# Altium PCB Smart_Station.PcbDoc
Units mm, origin at the board's own origin, x right, y up, seen from the top; angles counter-clockwise.
Board outline 80 x 70 mm, 2 copper layers (Top Layer, Bottom Layer); 24 components, 19 nets, 94 pads, 1 vias.
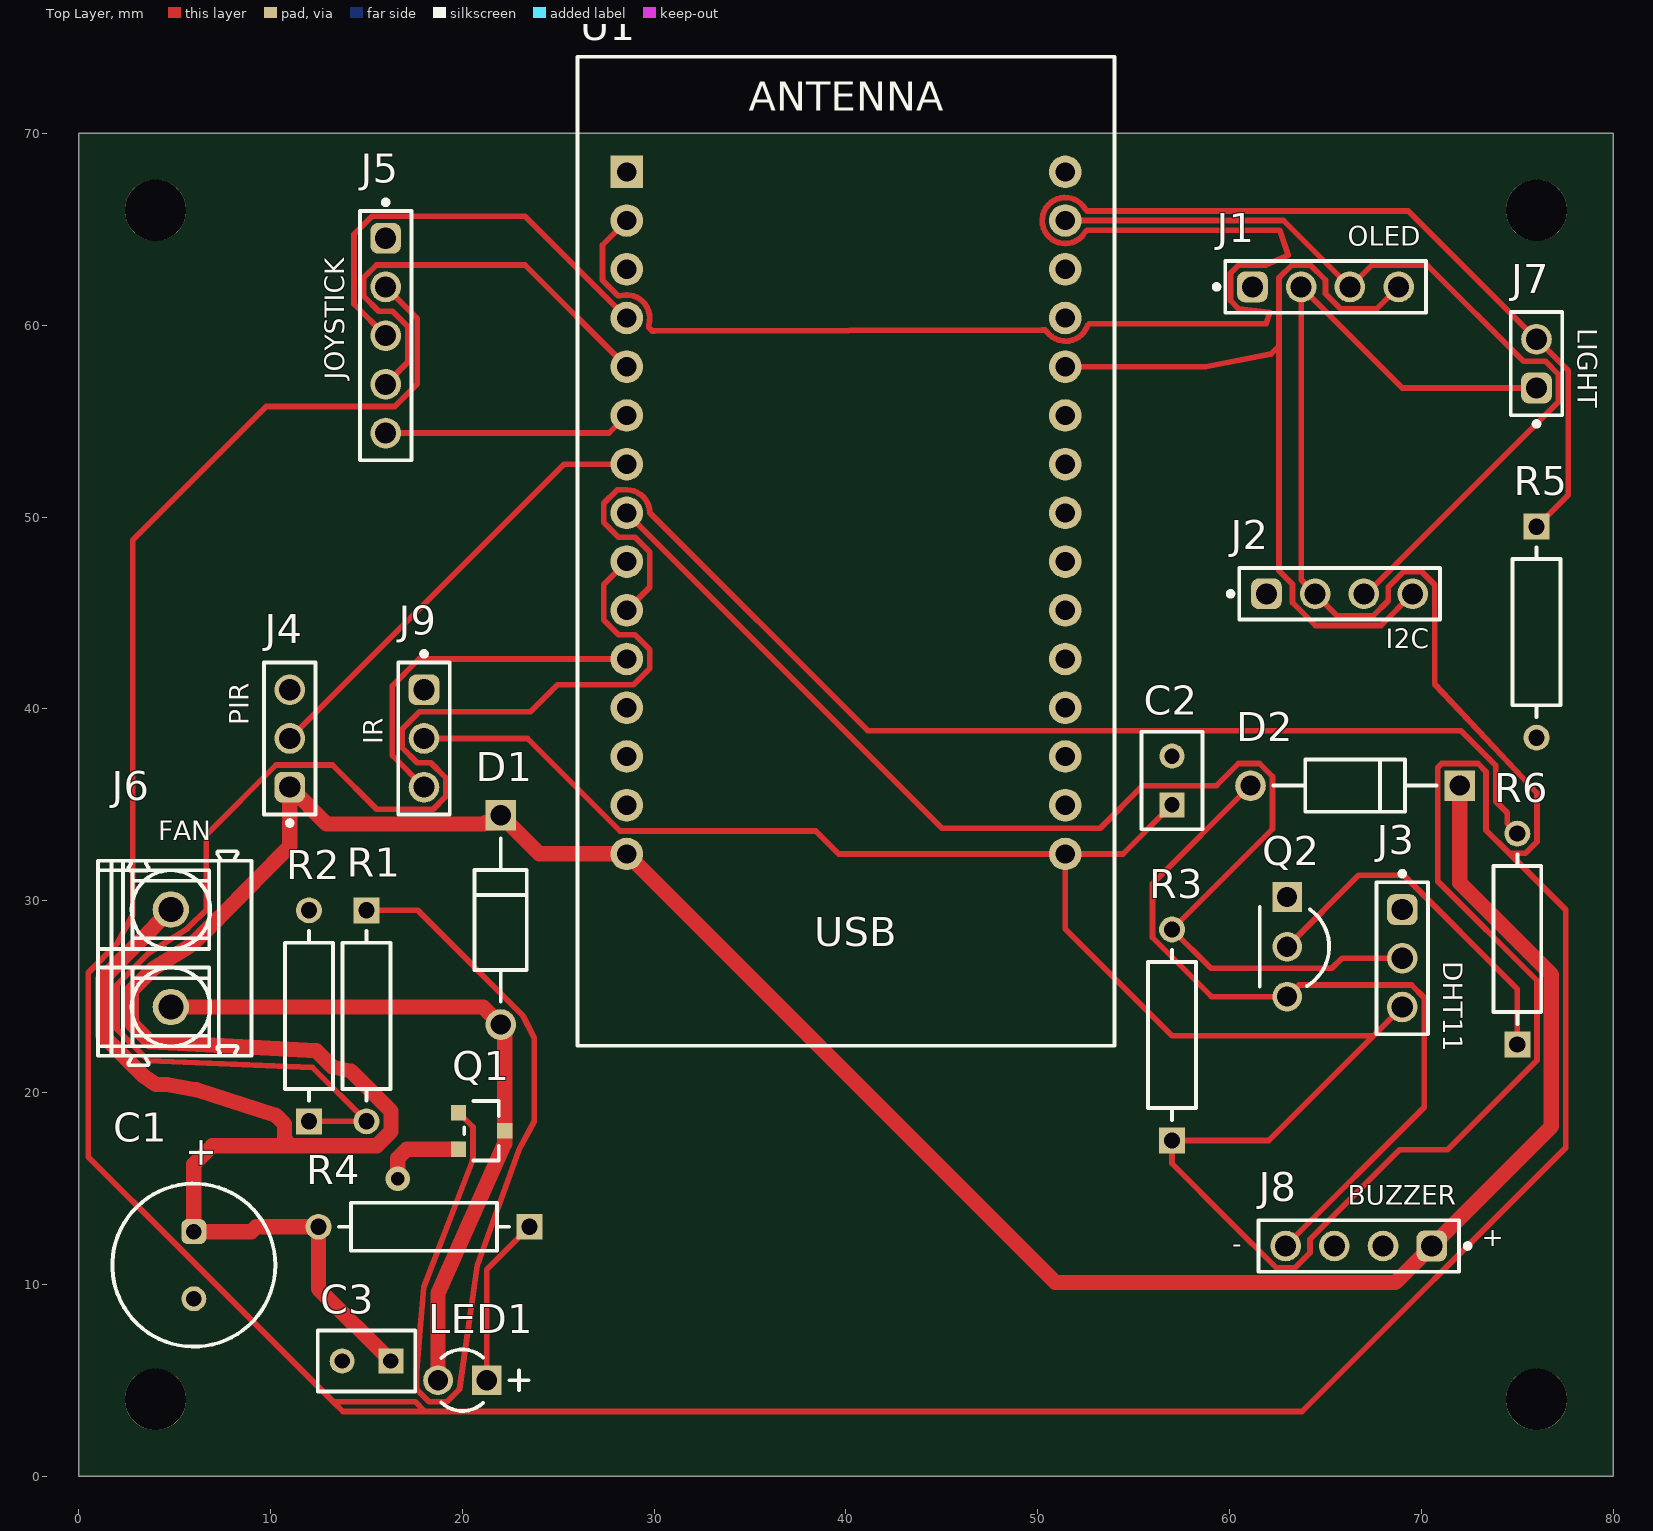
[diagram p0: Top Layer view]
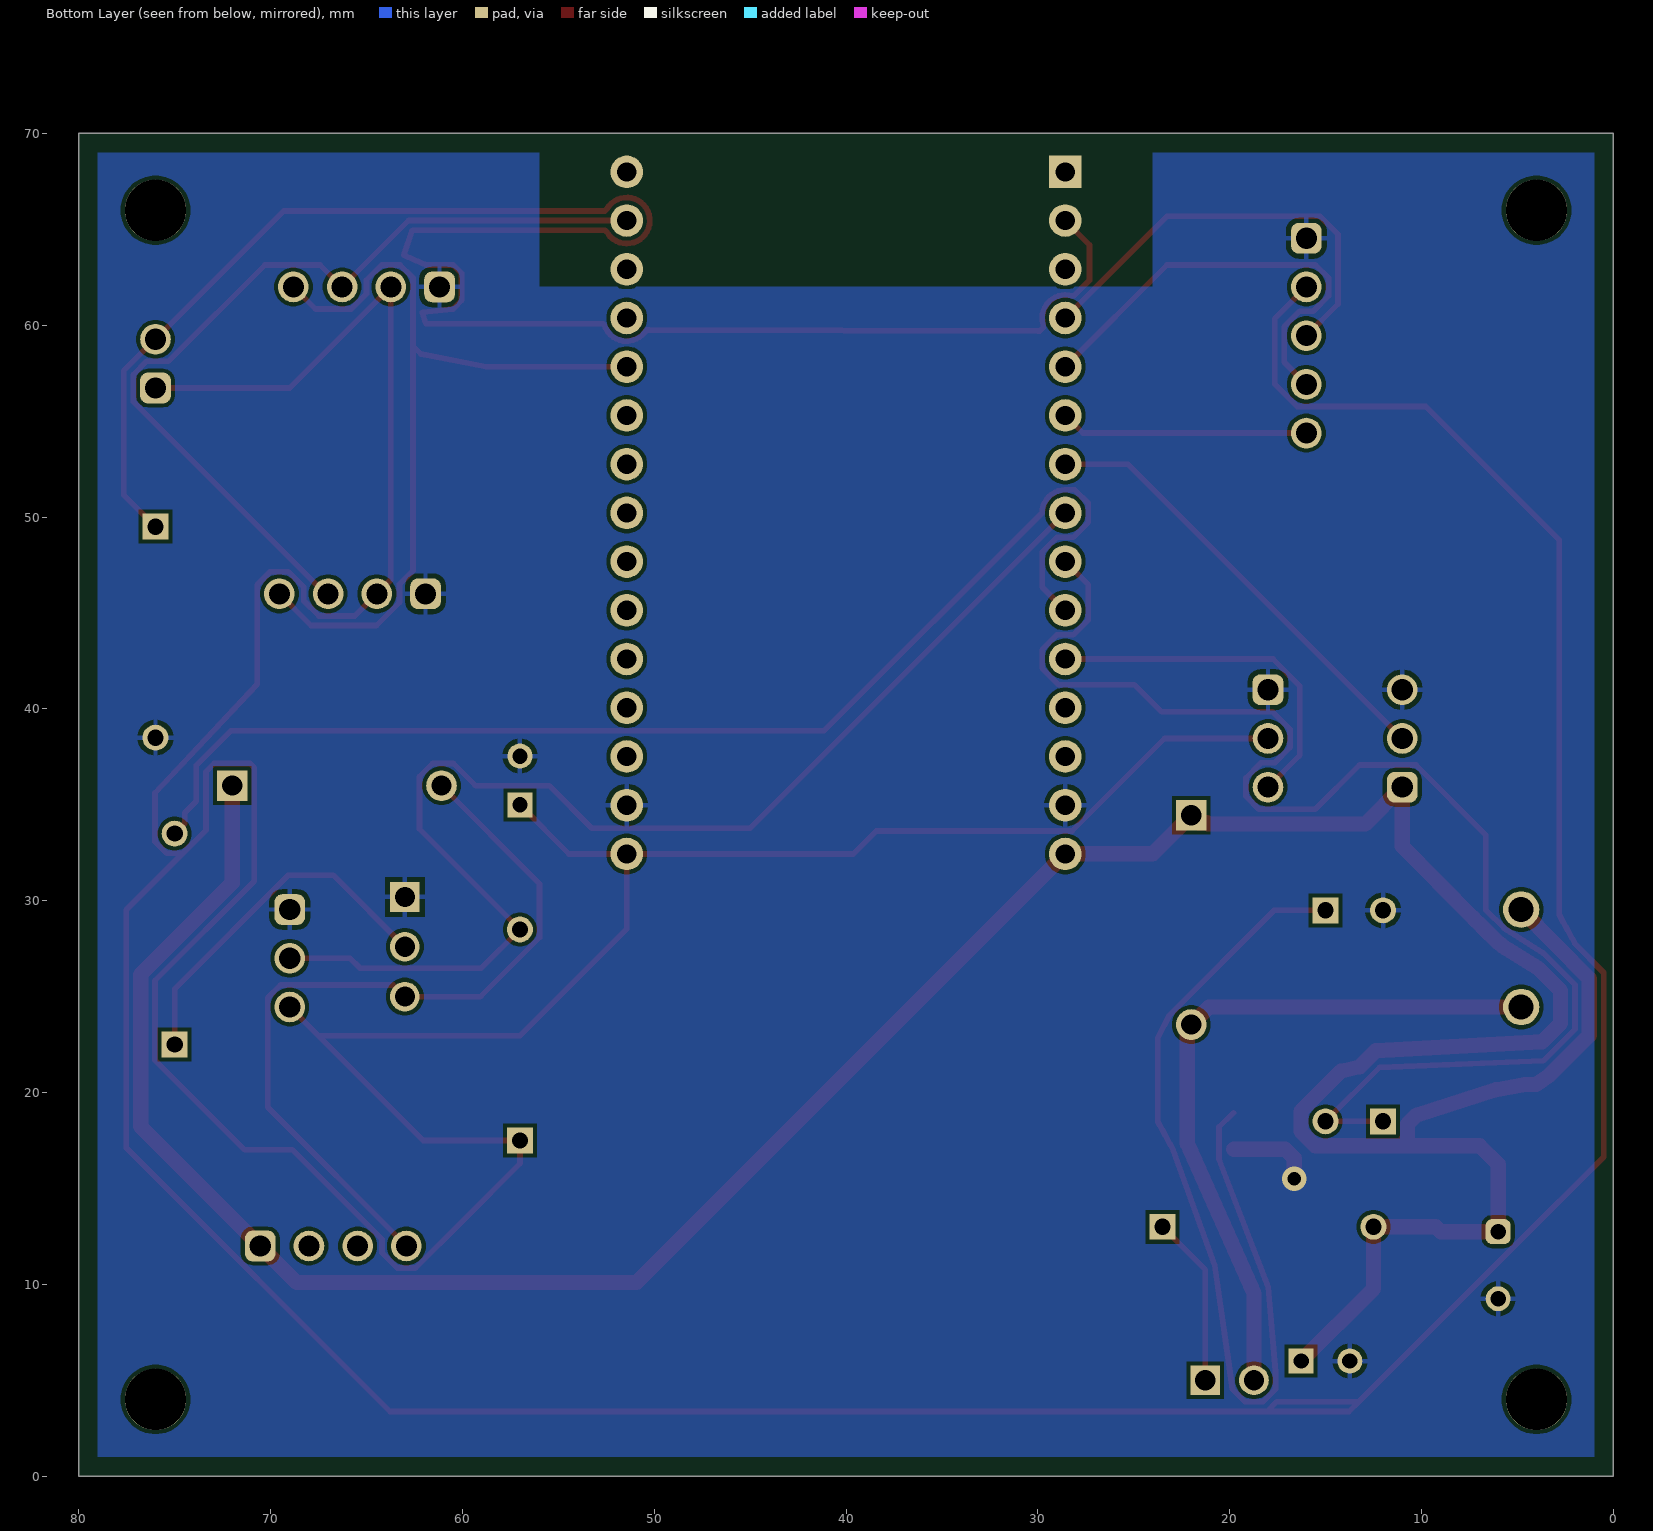
[diagram p1: Bottom Layer view, seen from below]
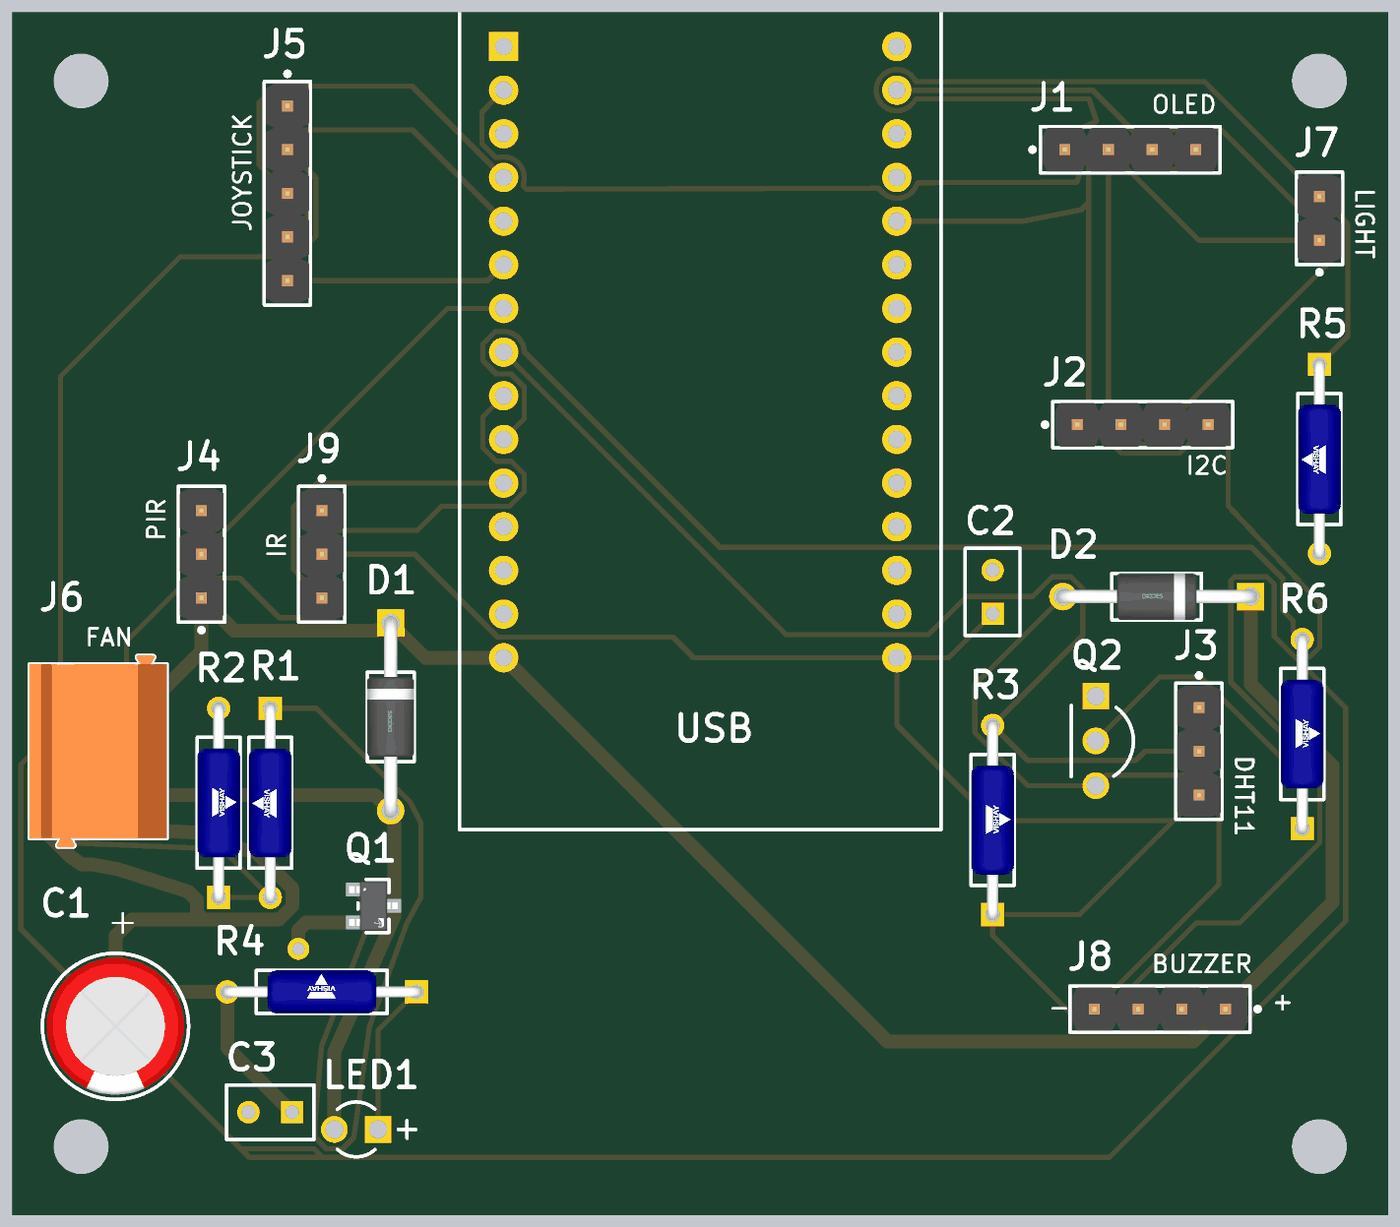
[diagram p2: 3D render of the assembled board from above, using the file's embedded part models]

## Layer stack, top to bottom
Top Solder: solder mask 0.0102, Solder Resist, Dk 3.5
Top Layer: signal copper 0.0356
Dielectric 1: dielectric 0.32, FR-4, Dk 4.8
Bottom Layer: signal copper 0.0356
Bottom Solder: solder mask 0.0102, Solder Resist, Dk 3.5

## Board outline
0,0 0,70 80,70 80,0

## Design rules (kind name [scope] priority, off if disabled: settings)
Clearance [All] p1: gap=0.2 ignorepadtopadclearanceinfootprint=FALSE
HoleSize [All] p1: absolutevalues=TRUE maxlimit=6.4 minlimit=0.3 maxpercent=80.000 minpercent=20.000
PolygonConnect [All] p1: connectstyle=Relief reliefconductorwidth=0.254 reliefentries=4 polygonreliefangle="90 Angle" airgapwidth=0.254
RoutingVias [All] p1: holewidth=0.4 width=0.8 viastyle="Through Hole" minholewidth=0.4 minwidth=0.8 maxholewidth=0.4 maxwidth=0.8
SolderMaskExpansion [All] p1: expansion=0 istentingtop=FALSE
SupplyNets "Schematic Supply Nets_2" [InNet('+3V3')] p1: voltage=0.000
SupplyNets "Schematic Supply Nets_1" [InNet('+5V')] p2: voltage=0.000
SupplyNets "Schematic Supply Nets" [InNet('GND')] p3: voltage=0.000
Width Power [InNet('+5V') or InNet('GND') or InNet('FAN_NEG')] p1: maxlimit=1.5 minlimit=0.2 preferedwidth=0.8
Width [All] p2: maxlimit=1.5 minlimit=0.2 preferedwidth=0.3
29 further rules are at their usual default settings.

## Components (designator, comment, footprint, x,y, rotation, side; value= is the part's Value field where it differs from the comment)
C1 "860020374012" WCAP-ATG5_D8H11.5 6,11 r90 top
C2 "C320C104K5R5TA" CAPR51-254-508X318X736 57,36.27 r90 top
C3 "C320C104K5R5TA" CAPR51-254-508X318X736 15,6 r180 top
D1 "1N5819-T" FP-DO-41_Plastic-MFG 22,29 r270 top value="110 pF"
D2 "1N5819-T" FP-DO-41_Plastic-MFG 66.544,36 r180 top value="110 pF"
J1 "61300411121" 61300411121 65,62 r0 top
J2 "61300411121" 61300411121 65.73,46 r0 top
J3 "61300311121" 61300311121 69,27 r270 top
J4 "61300311121" 61300311121 11,38.46 r90 top
J5 "61300511121" 61300511121 16,59.46 r270 top
J6 "1760490000" PM_5_08_90_02 5,27 r270 top
J7 "61300211121" 61300211121 76,58 r90 top
J8 "61300411121" 61300411121 66.73,12 r180 top
J9 "61300311121" 61300311121 18,38.46 r270 top
LED1 "L-934GD" KING-L-934GD 20,5 r180 top
Q1 "AO3400A" FP-SOT23-MFG 21,18 r0 top
Q2 "PN2222ATF" FAIR-TO-92-3 63,27.6 r270 top
R1 "100R" FP-RLR07-MFG 15,24 r270 top
R2 "100K" FP-RLR07-MFG 12,24 r90 top
R3 "RLR07C1002FSB14" FP-RLR07-MFG 57,23 r90 top
R4 "1K" FP-RLR07-MFG 18,13 r180 top
R5 "10K" FP-RLR07-MFG 76,44 r270 top
R6 "1K" FP-RLR07-MFG 75,28 r90 top
U1 "ESP32_DEVKIT_V1_30P" ESP32_DEVKIT_V1_30P 28.57,68 r0 top

## Footprints (in the part's own frame and the unit in brackets; to place one, negate y for a bottom-side part, rotate by r counter-clockwise, add the part's x,y. Pads: shape width x height; smd on the part's side, far side on the other; paste and mask are expansions set on the pad)
61300211121 [mm] "Pin Header, pitch 2.54 mm, THT, Vertical, single row, 2p"
  rrect50% 1.6x1.6 hole 1.1: 1(-1.27,0)
  round 1.6 hole 1.1: 2(1.27,0)
  silkscreen extent -3.26,-1.34 2.69,1.35, body extent -2.54,-1.27 2.54,1.27, height 8.57
61300311121 [mm] "Pin Header, pitch 2.54 mm, THT, Vertical, single row, 3p"
  rrect50% 1.6x1.6 hole 1.1: 1(-2.54,0)
  round 1.6 hole 1.1: 2(0,0) 3(2.54,0)
  silkscreen extent -4.53,-1.35 3.96,1.34, body extent -3.81,-1.27 3.81,1.27, height 8.57
61300411121 [mm] "Pin Header, pitch 2.54 mm, THT, Vertical, single row, 4p"
  rrect50% 1.6x1.6 hole 1.1: 1(-3.81,0)
  round 1.6 hole 1.1: 2(-1.27,0) 3(1.27,0) 4(3.81,0)
  silkscreen extent -5.8,-1.35 5.23,1.35, body extent -5.08,-1.27 5.08,1.27, height 8.57
61300511121 [mm] "Pin Header, pitch 2.54 mm, THT, Vertical, single row, 5p"
  rrect50% 1.6x1.6 hole 1.1: 1(-5.08,0)
  round 1.6 hole 1.1: 2(-2.54,0) 3(0,0) 4(2.54,0) 5(5.08,0)
  silkscreen extent -7.07,-1.34 6.5,1.35, body extent -6.35,-1.27 6.35,1.27, height 8.57
CAPR51-254-508X318X736 [mm] "THD, 2-Leads, Body 5.08x3.18mm"
  rect 1.3x1.3 hole 0.8: 1(-1.27,0)
  round 1.3 hole 0.8: 2(1.27,0)
  silkscreen extent -2.54,-1.59 2.54,1.59, body extent -2.54,-1.59 2.54,1.59, height 7.36
ESP32_DEVKIT_V1_30P [mm]
  rect 1.7x1.7 hole 1: 1(0,0)
  round 1.7 hole 1: 2(0,-2.54) 3(0,-5.08) 4(0,-7.62) 5(0,-10.16) 6(0,-12.7) 7(0,-15.24) 8(0,-17.78) 9(0,-20.32) 10(0,-22.86) 11(0,-25.4) 12(0,-27.94) 13(0,-30.48) 14(0,-33.02) 15(0,-35.56) 16(22.86,-35.56) 17(22.86,-33.02) 18(22.86,-30.48) 19(22.86,-27.94) 20(22.86,-25.4) 21(22.86,-22.86) 22(22.86,-20.32) 23(22.86,-17.78) 24(22.86,-15.24) 25(22.86,-12.7) 26(22.86,-10.16) 27(22.86,-7.62) 28(22.86,-5.08) 29(22.86,-2.54) 30(22.86,0)
  silkscreen extent -2.57,-45.56 25.43,6
FAIR-TO-92-3 [mm] "TO, 3-Leads, Body Dia 4.79mm, Pitch 2.6mm"
  rect 1.55x1.55 hole 1.05: 1(-2.6,0)
  round 1.55 hole 1.05: 2(0,0) 3(2.6,0)
  silkscreen extent -2.07,-1.43 2.07,2.19, body extent -2.4,-1.47 2.4,2.2, height 8.49
FP-DO-41_Plastic-MFG [mm]
  rect 1.6x1.6 hole 1.05 paste-2539.97 mask+0: 1(-5.456,0)
  round 1.6 hole 1.05 paste-2539.97 mask+0: 2(5.456,0)
  silkscreen extent -4.26,-1.36 4.26,1.36, body extent -6.36,-1.46 6.36,1.46, height 0.25
FP-RLR07-MFG [mm]
  rect 1.35x1.35 hole 0.85 paste-2539.97 mask+0: 1(-5.5,0)
  round 1.35 hole 0.85 paste-2539.97 mask+0: 2(5.5,0)
  silkscreen extent -4.42,-1.25 4.42,1.25, body extent -6.27,-1.35 6.27,1.35, height 0.25
FP-SOT23-MFG [mm]
  rect 0.8x0.8 smd paste+0 mask+0: 1(-1.2,0.95) 2(-1.2,-0.95) 3(1.2,0)
  silkscreen extent -0.9,-1.55 0.9,1.55, body extent -1.7,-1.78 1.7,1.78, height 0.25
KING-L-934GD [mm] "THD, 2-Leads, Dia 3.2mm, Body Length 4.9mm"
  rect 1.55x1.55 hole 1.05: 1(-1.27,0)
  round 1.55 hole 1.05: 2(1.27,0)
  silkscreen extent -3.46,-1.6 1.1,1.6
PM_5_08_90_02 [mm] "PM 5.08/02/90 3.5"
  round 1.9 hole 1.3: A1(-2.54,-0.2) A2(2.54,-0.2)
  silkscreen extent -5.58,-4 5.58,4, body extent -5.58,-4 5.58,4, height 10.01
WCAP-ATG5_D8H11.5 [mm] "Aluminum Electrolytic Capacitors, 8x11.5mm"
  rrect50% 1.3x1.3 hole 0.8: 1(1.75,0)
  round 1.3 hole 0.8: 2(-1.75,0)
  silkscreen extent -4.25,-4.25 4.25,4.25, body extent -3.99,-4 4,4, height 11.81

## Part data
C1: library part CMP-03913-53914176-1, "860020374012 WCAP-ATG5 Aluminum Electrolytic Capacitors", Capacitance=470µF, Case/Package=Radial, Leakage Current=75.2µA, Max Operating Temperature=105°C, Min Operating Temperature=-40°C, Ripple Current=370mA, Tolerance=20%, Voltage Rating=16V, Diameter=8mm, Height=11.5mm, Height - Seated (Max)=13.0048mm, Lead Pitch=3.5052mm, Length=11.5mm, Life (Hours)=2000hours, Mount="Through Hole", NexarPartId=53914176, Packaging="Tape & Box (TB)", Pitch=3.5mm, Polarity=Polar, RoHS=Compliant, Voltage Rating (DC)=16V
C2 C3: library part CMP-1664-00004-1, "Radial Leaded Multilayer Ceramic Capacitor, 0.1 uF, +/- 10%, 50 V, -55 to 125 degC, 2-Pin THD, RoHS, Tape and Reel", Case\Package=SOT-23-5, Dropout Voltage="260 mV", Max Input Voltage="8 V", Max Operating Temperature="85 degC", Max Power Dissipation="250 mW", Min Operating Temperature="-40 degC", Output Current="150 mA", Output Voltage="5 V", Package Quantity=3000, ComponentLink1Description="Manufacturer URL", ComponentLink1URL=http://www.kemet.com/, ComponentLink2Description=Datasheet, ComponentLink2URL=http://www.kemet.com/docfinder?Partnumber=C320C104K5R5TA, DatasheetVersion=Dec-15, Height="1.3 mm", Length="3 mm", Mount="Surface Mount", Outputs=1, PackageDescription="2-Pin Through Hole Device, Body 5.08 x 3.18 mm, Pitch 2.54 mm", PackageReference=CAPR51-254-508X318X736, Packaging="Tape and Reel", Pins=5, Radiation Hardening=No, RoHSCompliant=true, Width="1.8 mm"
D1 D2: library part CMP-12790-000042-1, "DIODE SCHOTTKY 40V 1A DO41", Capacitance="110 pF", Forward Current=1A, Manufacturer="Diodes Inc.", Max Junction Temp=+125°C, Max Repetitive Reverse Voltage=40V, Max Surge Forward Current=25A, Package="DO-41 (Plastic)", Peak Reverse Current=1mA, Temperature="-65°C to +125°C", Temperature Range Low=-65°C, Automotive=No, Category=Diode, ComponentLink2Description=Datasheet, ComponentLink2URL=https://www.diodes.com/assets/Datasheets/ds23001.pdf, Device Class L1="Discrete Semiconductors", Device Class L2=Diodes, Device Class L3="Schottky Diodes", Digikey Description="DIODE SCHOTTKY 40V 1A DO41", Footprint Url=https://www.diodes.com/assets/Package-Files/DO-41-Plastic.pdf, Height=2.72mm, Ipc Land Pattern Name=DIOPA1091W105L521D272, Lead Free=Yes, Manufacturer Part Number=1N5819-T, Mouser Description="Schottky Diodes & Rectifiers Vr/40V Io/1A T/R", Octopart=https://octopart.com/1n5819-t-diodes+inc.-55389586, Reverse Voltage=40V, RoHS=TRUE, Temperature Range High=+125°C
J1 J2 J8: library part CMP-1502-01064-4, "THT Vertical Pin Header WR-PHD, Pitch 2.54 mm, Single Row, 4 pins", Color=Black, Contact Resistance=20mΩ, Current Rating=3A, Max Operating Temperature=105°C, Min Operating Temperature=-40°C, Operating Supply Voltage=250V, Connector Type="Male Pin", Contact Material=Gold, Contact Mating Length=5.9944mm, Contact Plating=Gold, Gender=Male, Height=8.89mm, Lead Free="Lead Free", Lead Pitch=2.54mm, Mount="Through Hole", Number of Contacts=4, Number of Pins=4, Number of Positions=4, Number of Rows=1, Orientation=Vertical, Packaging=Bulk, Pitch=2.54mm, RoHS=Compliant, Termination=Solder, Voltage Rating=250V
J3 J4 J9: library part CMP-1502-01062-4, "THT Vertical Pin Header WR-PHD, Pitch 2.54 mm, Single Row, 3 pins", Color=Black, Contact Resistance=20mΩ, Current Rating=3A, Max Operating Temperature=105°C, Min Operating Temperature=-40°C, Operating Supply Voltage=250V, Connector Type="Male Pin", Contact Material=Gold, Contact Mating Length=5.9944mm, Contact Plating=Gold, Gender=Male, Height=8.94mm, Lead Free="Lead Free", Lead Pitch=2.54mm, Mount="Through Hole", Number of Contacts=3, Number of Pins=3, Number of Positions=3, Number of Rows=1, Orientation=Vertical, Packaging=Bulk, Pitch=2.54mm, RoHS=Compliant, Termination=Solder, Voltage Rating=250V
J5: library part CMP-1502-01068-4, "THT Vertical Pin Header WR-PHD, Pitch 2.54 mm, Single Row, 5 pins", Color=Black, Contact Resistance=20mΩ, Current Rating=3A, Max Operating Temperature=105°C, Min Operating Temperature=-40°C, Operating Supply Voltage=250V, Connector Type="Male Pin", Contact Material=Gold, Contact Mating Length=5.9944mm, Contact Plating=Gold, Gender=Male, Height=8.89mm, Lead Free="Lead Free", Lead Pitch=2.54mm, Mount="Through Hole", Number of Contacts=5, Number of Pins=5, Number of Positions=5, Number of Rows=1, Orientation=Vertical, Packaging=Bulk, Pitch=2.54mm, RoHS=Compliant, Termination=Solder, Voltage Rating=250V
J6: library part CMP-1559-01627-1, "OMNIMATE Signal - series PM", Colour=Orange, Manufacturer=Weidmueller, Rated_current_use_group_B_UL_1059="15 A", Rated_voltage_for_surge_voltage_class_pollution_degree_II_2="600 V", Rated_voltage_use_group_B_UL_1059="300 V", UL_94_flammability_rating=V-0, ComponentLink1Description="Manufacturer URL", ComponentLink1URL=http://www.weidmueller.com/, ComponentLink2Description="URL Link1", ComponentLink2URL=http://catalog.weidmueller.com/catalog/Start.do?localeId=en&ObjectID=1760490000, Contact_material=Cu-Leg, Contact_surface=tinned, Insulating_material="Wemid (PA)", Mounting_onto_the_PCB="Solder connection", No_of_poles=2, PackageReference=PM_5_08_90_02, Packaging=Box, PartNumber=1760490000, Pitch_inch="0,2 inch", Pitch_mm="5,08 mm", Qty="500 PCS", Revision=V1, Short_text_for_material="PM 5.08/02/90 3.5SN OR BX", Side_termination_characteristic="closed side", Solder_pin_length_mm="3,5 mm", Solid_max_H05_07_V_U="2,5 mm²", Solid_min_H05_07_V_U="0,13 mm²", Wire_cross_section_AWG_max_UL_1059="AWG 14", Wire_cross_section_AWG_min_UL_1059="AWG 26"
J7: library part CMP-1712-00002-7, "THT Vertical Pin Header WR-PHD, Pitch 2.54 mm, Single Row, 2 pins", Color=Black, Contact Resistance=20mΩ, Current Rating=3A, Max Operating Temperature=105°C, Min Operating Temperature=-40°C, Operating Supply Voltage=250V, Connector Type="Male Pin", Contact Gender=Male, Contact Material=Gold, Contact Mating Length=5.9944mm, Contact Plating=Gold, Gender=Male, Height=8.94mm, Housing Material=PBT, Lead Free="Lead Free", Lead Pitch=2.54mm, Mount="Through Hole", Number of Contacts=2, Number of Pins=2, Number of Positions=2, Number of Rows=1, Orientation=Vertical, Packaging=Bulk, Pitch=2.54mm, REACH SVHC=No, RoHS=Compliant, Termination="Through Hole", Voltage Rating=250V
LED1: library part CMP-2000-06531-1, "Green Diffused LED, 2.2 V, -40 to 85 degC, 2-Pin THD, RoHS", Forward Voltage=2.2V, LED Colours=Green, Manufacturer=Kingbright, Package Description="2-Pin Through Hole Device, Dia 3.2 mm, Body Length 4.9 mm", Package Type=3mm(T-1), Datasheet URL=https://datasheet.ciiva.com/11773/0900766b801ff775-11773480.pdf, Datasheet Version="Rev. 1, 09/2001", Dimensions=3x4.6mm, Dominant Wavelength=568nm, LED Material=GaP, Lens Colour=Green, Lens Shape=Round, Luminous Intensity=20mcd, Manufacturer URL=http://www.kingbright.com/, Mounting Technology=ThroughHole, Mounting Type=ThroughHole, Number of LEDs=1, Number of Pins=2, Package Reference=L-934GD, Series=Round, Viewing Angle=60°
Q1: library part CMP-83955-000006-1, "MOSFET N-CH 30V 5.7A SOT23", Case/Package=SOT-23, Continuous Drain Current (ID)=5.7A, Drain to Source Voltage (Vdss)=30V, Gate to Source Voltage (Vgs)=12V, Input Capacitance=630pF, Max Operating Temperature=150°C, Max Power Dissipation=1.4W, Min Operating Temperature=-55°C, Lead Free="Lead Free", Mount="Surface Mount", Number of Elements=1, Number of Pins=3, Packaging="Tape and Reel", Power Dissipation=1.4W, Radiation Hardening=No, Rds On Max=26.5mR
Q2: library part CMP-2000-06911-1, "NPN General-Purpose Amplifier, 40 V, -55 to 150 degC, 3-Pin TO-92, RoHS, Tape and Reel", Collector- Base Voltage VCBO=75V, Collector- Emitter Voltage VCEO Max=40V, Collector-Emitter Saturation Voltage=1V, DC Current Gain hFE Max=300, Emitter- Base Voltage VEBO=6V, Manufacturer=FairchildSemiconductor, Maximum DC Collector Current=1A, Maximum Operating Temperature=+150C, Maximum Power Dissipation=625mW, Minimum Operating Temperature=-55C, Package / Case=TO-92-3KinkedLead, Package Description="3-Pin Transistor Outline Package, Body Dia 4.79 mm, Pitch 2.6 mm", Package Reference=TO-92, <PCN>=http://www.mouser.com/PCN/3.26.10LTBDFairchild.pdf, Brand=FairchildSemiconductor, Configuration=Single, Datasheet URL=https://www.fairchildsemi.com/datasheets/PN/PN2222A.pdf, Datasheet Version="Rev. 1.1.0, 07/2014", DC Collector/Base Gain hfe Min=100, Factory Pack Quantity=2000, Gain Bandwidth Product fT=300MHz, Manufacturer URL=https://www.fairchildsemi.com/, Mounting Style=ThroughHole, Mounting Technology=ThroughHole, Packaging=Reel, Product Category=BipolarTransistors-BJT, RoHS=Details, Series=PN2222, Transistor Polarity=NPN, Unit Weight=0.008466oz
R1 R2 R3 R4 R5 R6: library part CMP-00030-39449004-1, "RLR07C1002FSB14 Fixed Resistor, Metal Film, 0.25W, 10000ohm, 250V, 1% +/-Tol, 100ppm/Cel, Through Hole Mount", Case/Package=Conformal, Max Operating Temperature=150°C, Max Power Dissipation=250mW, Min Operating Temperature=-65°C, Resistance=10kΩ, Temperature Coefficient=100ppm/°C, Tolerance=1%, Voltage Rating=250V, Composition="Metal Film", Contact Plating="Lead, Tin", Diameter=2.29mm, Failure Rate=0.001%, Features="Military, Moisture Resistant, Weldable", Lead Diameter=640µm, Lead Free="Contains Lead", Lead Length=38.1mm, Length=7.62mm, Military Standard=MIL-PRF-39017, Mount="Through Hole", NexarPartId=39449004, Number of Pins=14, Number of Terminations=2, Packaging=Bulk, Power Rating=250mW, Radiation Hardening=No, REACH SVHC=Unknown, RoHS=Non-Compliant, Schedule B="8533210090, 8533210090", Termination=Axial, Voltage Rating (DC)=250V, Width=2.29mm, Wire/Cable Diameter=50.8µm

## Free pads (board coordinates)
  round 3.2 hole 3.2 unplated: H1(4,4) H2(76,4) H3(4,66) H4(76,66)

## Via types
v1: diameter 1.27, hole 0.711, Top Layer to Bottom Layer, 1 vias

## Nets (pads, with @x,y where several pads share a name; then routed paths per layer and width w, separated by ;. In a path a pad name is that pad's centre, name@x,y a point inside that pad or via, vN(x,y) a via of type N, cw(c..) or ccw(c..) an arc to the next point about the centre after c; other vN are vias at no path point)
+3V3: C2.1 J1.2 J2.2 J3.3 J5.2 J7.1 J9.2 R3.1 U1.16 | length 355.1
  Top Layer w0.3: J5.2 17.65,60.35 17.65,56.944 16.476,55.77 9.77,55.77 2.812,48.812 2.812,29.26 1.995,27.758 0.5,26.241 0.5,16.645 5,12.145 13.27,3.875 ; J9.2 23.393,38.46 28.213,33.64 38.421,33.64 39.621,32.44 U1.16 ; C2.1 54.44,32.44 U1.16 ; J3.3 67.502,22.962 ; J7.1 69,56.73 J1.2 63.73,46.73 J2.2 65.61,44.85 67.476,44.85 68.27,45.644 68.27,46.356 69.064,47.15 70.016,47.15 70.69,46.476 70.69,41.286 76.025,35.611 76.025,33.075 75.425,32.475 74.575,32.475 ; 13.27,3.875 13.77,3.375 18.057,3.375 ; 13.27,3.875 17.557,3.875 18.057,3.375 ; 18.057,3.375 63.776,3.375 77.525,17.124 77.525,29.525 74.575,32.475 ; U1.16 51.43,28.532 57,22.962 67.502,22.962 ; 67.502,22.962 62.04,17.5 R3.1 57,16.294 59.984,13.309 62.444,10.85 63.396,10.85 64.19,11.644 64.19,12.356 68.852,17.018 71.363,17.018 76.025,21.68 76.025,25.84 70.85,31.015 70.85,36.945 71.055,37.15 72.945,37.15 73.372,36.723 73.372,33.678 74.575,32.475
+5V: C1.1 C3.1 D1.1 D2.1 J4.1 J6.A1 J8.1 R4.2 U1.15 | length 182
  Top Layer w0.8: J6.A1 1.25,25.93 1.25,22.99 3.33,20.91 4.021,20.42 4.607,20.42 6.135,20.142 10.256,18.825 10.725,18.356 10.725,17.576 11.076,17.225 ; C3.1 12.5,9.77 R4.2 9.248,13 8.998,12.75 C1.1 6,16.266 6.959,17.225 10.725,17.225 11.076,17.225 ; D2.1 72,30.926 76.775,26.151 76.775,18.235 J8.1 68.64,10.1 50.91,10.1 U1.15 24.016,32.44 22.228,34.228 D1.1 21.6,34.056 21.188,34.056 21.131,34 12.92,34 J4.1 11,32.841 7.307,29.111 6.865,28.67 5.949,27.777 5.777,27.647 3.935,26.494 2.75,25.309 2.75,23.611 3.717,22.644 12.385,22.176 13.216,21.345 14.192,21.111 16.275,19.028 16.275,17.972 15.528,17.225 11.076,17.225
BUZZ: R6.2 U1.10 | length 66.4
  Top Layer w0.3: U1.10 29.77,46.34 29.77,48.177 28.997,48.95 28.143,48.95 27.37,49.723 27.37,50.717 28.073,51.42 28.578,51.42 ; 28.575,51.42 cw(c28.575,51.12) 28.578,51.42 ; R6.2 74.475,34.025 74.475,34.586 73.872,35.189 73.872,37.057 72.069,38.86 41.14,38.86 29.77,50.23 ; 28.578,51.42 cw(c28.57,50.22) 29.77,50.23 ; 28.578,51.42 cw(c28.57,50.22) 29.77,50.23
BUZZ_NEG: D2.2 J8.4 Q2.3 | length 42
  Top Layer w0.3: D2.2 55.975,30.887 55.975,28.075 59.05,25 Q2.3 63.61,25.61 69.476,25.61 70.15,24.936 70.15,19.23 J8.4
DHT_DATA: J3.2 R3.2 U1.8 | length 65.4
  Top Layer w0.3: U1.8 45.01,33.78 53.254,33.78 55.474,36 59.309,36 60.459,37.15 61.564,37.15 62.238,36.476 62.238,33.738 R3.2 59.025,26.475 65.329,26.475 65.854,27 J3.2
FAN_NEG: D1.2 J6.A2 LED1.2 Q1.3 | length 36.9
  Top Layer w0.8: J6.A2 21.084,24.46 D1.2 22.2,23.344 Q1.3 22.2,17.337 18.73,9.535 LED1.2
FAN_PWM: R1.2 R2.1 U1.9 | length 72.1
  Top Layer w0.3: R2.1 R1.2 12.189,21.311 3.64,21.66 2,23.3 2,25.62 3.624,27.244 5.628,28.527 5.629,28.527 ccw(c5.467,28.779) 5.679,28.568 ccw(c5.467,28.779) 5.699,28.59 5.709,28.602 5.798,28.691 cw(c6.009,28.478) 5.799,28.692 6.555,29.42 ccw(c6.345,29.634) 6.557,29.422 6.645,29.51 6.645,33.425 10.289,37.07 13.233,37.07 15.533,34.77 18.476,34.77 19.15,35.444 19.15,36.396 18.356,37.19 17.644,37.19 16.85,37.984 16.85,38.936 17.764,39.85 23.556,39.85 24.966,41.26 28.927,41.26 29.77,42.103 29.77,43.097 28.997,43.87 28.143,43.87 27.37,44.643 27.37,46.48 U1.9
GND: C1.2 C2.2 C3.2 J1.1 J2.1 J3.1 J4.3 J5.1 J9.1 Q1.2 Q2.1 R2.2 R5.2 U1.14 U1.17 | length 4.4
  Top Layer w0.8: v1(16.636,15.506) 16.636,16.581 17.105,17.05 Q1.2
I2C_SCL: J1.3 J2.3 U1.29 | length 45.7
  Top Layer w0.3: U1.29 62.81,65.46 J1.3 67.42,63.15 70.287,63.15 75.317,58.12 76.471,58.12 77.15,57.441 77.15,56.019 67.131,46 J2.3
I2C_SDA: J1.4 J2.4 U1.26 | length 44.4
  Top Layer w0.3: U1.26 58.766,57.84 62.156,58.5 62.58,58.924 ; J1.4 67.66,60.85 65.794,60.85 65,61.644 65,62.356 64.206,63.15 63.254,63.15 62.58,62.476 62.58,58.924 ; J2.4 67.89,44.35 64.484,44.35 63.282,45.552 63.282,46.499 62.58,47.201 62.58,58.924
IR_OUT: J9.3 U1.11 | length 18.8
  Top Layer w0.3: J9.3 16.35,37.57 16.35,41.211 17.739,42.6 U1.11
JOY_SW: J5.5 U1.6 | length 13
  Top Layer w0.3: J5.5 27.65,54.38 U1.6
JOY_X: J5.3 U1.4 | length 22.8
  Top Layer w0.3: J5.3 14.35,61.11 14.35,64.751 15.289,65.69 23.26,65.69 U1.4
JOY_Y: J5.4 U1.5 | length 23.6
  Top Layer w0.3: J5.4 17.15,58.07 17.15,59.936 16.356,60.73 15.644,60.73 14.85,61.524 14.85,62.476 15.524,63.15 23.26,63.15 U1.5
LIGHT: J7.2 R5.1 U1.2 | length 114.3
  Top Layer w0.3: 28.238,61.543 28.114,61.543 27.309,62.348 27.305,64.066 27.305,64.188 U1.2 ; 29.722,60.003 29.722,60.043 ; 52.487,66.048 52.575,65.96 ; R5.1 77.65,51.15 77.65,57.648 76.028,59.27 J7.2 69.31,65.96 52.575,65.96 ; 29.722,60.043 ccw(c28.57,60.38) 28.384,61.566 cw(c28.57,60.38) 29.722,60.043 ; 29.722,60.043 29.722,59.878 29.81,59.791 29.898,59.703 30.021,59.703 50.252,59.752 50.376,59.752 50.465,59.663 50.477,59.651 ; 50.477,59.651 ccw(c51.43,60.38) 51.264,59.192 ; 50.477,59.651 ccw(c51.43,60.38) 51.264,59.192 ; 51.264,59.192 cw(c51.222,58.895) 51.279,59.189 ccw(c51.454,60.087) 51.456,59.172 ; 51.456,59.172 ccw(c51.453,60.372) 52.591,59.989 ; 51.456,59.172 ccw(c51.453,60.372) 52.591,59.989 ; 52.462,66.073 ccw(c51.43,65.46) 52.4,64.753 cw(c51.43,65.46) 52.462,66.073 ; 52.462,66.073 52.575,65.96 ; 52.487,64.872 ccw(c52.699,64.66) 52.486,64.871 52.487,64.872 ; 52.487,64.872 52.575,64.96 62.603,64.96 63.047,63.65 61.901,63.15 60.479,63.15 60.04,62.711 60.04,61.289 60.479,60.85 62.08,60.674 61.905,60.1 52.679,60.077 ; 52.591,59.989 cw(c52.804,59.778) 52.592,59.99 ; 52.591,59.989 cw(c52.804,59.778) 52.592,59.99 ; 52.592,59.99 52.679,60.077 ; 52.592,59.99 52.679,60.077
NetLED1_1: LED1.1 R4.1 | length 8.9
  Top Layer w0.3: LED1.1 21.27,10.77 R4.1
NetQ1_1: Q1.1 R1.1 | length 48.7
  Top Layer w0.3: R1.1 17.67,29.5 23.15,24.02 23.75,22.854 23.75,18.489 22.934,16.982 20.77,10.977 19.855,4.534 19.196,3.875 18.264,3.875 17.605,4.534 17.605,5.466 17.98,9.846 20.53,16.453 20.55,16.561 20.55,18.2 Q1.1
NetQ2_2: Q2.2 R6.1 | length 18.9
  Top Layer w0.3: Q2.2 66.725,31.325 69.076,31.325 75,25.401 R6.1
PIR_OUT: J4.2 U1.7 | length 23.5
  Top Layer w0.3: J4.2 25.3,52.76 U1.7
pads on no net: J8.2 J8.3 U1.1 U1.3 U1.12 U1.13 U1.18 U1.19 U1.20 U1.21 U1.22 U1.23 U1.24 U1.25 U1.27 U1.28 U1.30

## Polygon pours and split planes (outlines as drawn)
GND on Bottom Layer "GND_L02_P000" (solid, remove dead copper, pour order 0): 1,69 79,69 79,1 1,1

## Other copper
Bottom Layer:
  pour cut-out: 24,62 56,62 56,70 24,70

## Silkscreen, mask and mechanical layers (free items; w line width, h text height)
Top Overlay:
  text "OLED" at 66.15,64.15 h1
  text "LIGHT" at 78.15,59.85 h1 r270
  text "JOYSTICK" at 13.85,57.15 h1 r90
  text "I2C" at 68.15,43.15 h1
  text "PIR" at 8.85,39.15 h1 r90
  text "IR" at 15.85,38.15 h1 r90
  text "FAN" at 4.15,33.15 h1
  text "DHT11" at 71.15,26.85 h1 r270
  text "BUZZER" at 66.15,14.15 h1
  text "+" at 73.15,11.983 h1
  text "-" at 60.15,11.65 h1
Mechanical 1:
  the board outline again, w0.2

## Text inside footprints (layer, text, board x,y; h text height)
C1: Top Overlay "+" at 7,16 h1.5 r90
U1: Top Overlay "ANTENNA" at 34.92,71.175 h1.52; Top Overlay "USB" at 38.349,27.614 h1.52